# Altium PCB PCB_Final.PcbDoc (part 2 of 2)
Units mm, origin at the board's own origin, x right, y up, seen from the top; angles counter-clockwise.
Board outline 220 x 130 mm, 2 copper layers (Top Layer, Bottom Layer); 112 components, 88 nets, 442 pads, 69 vias.
Unrouted connection lines stored in the file: 1.
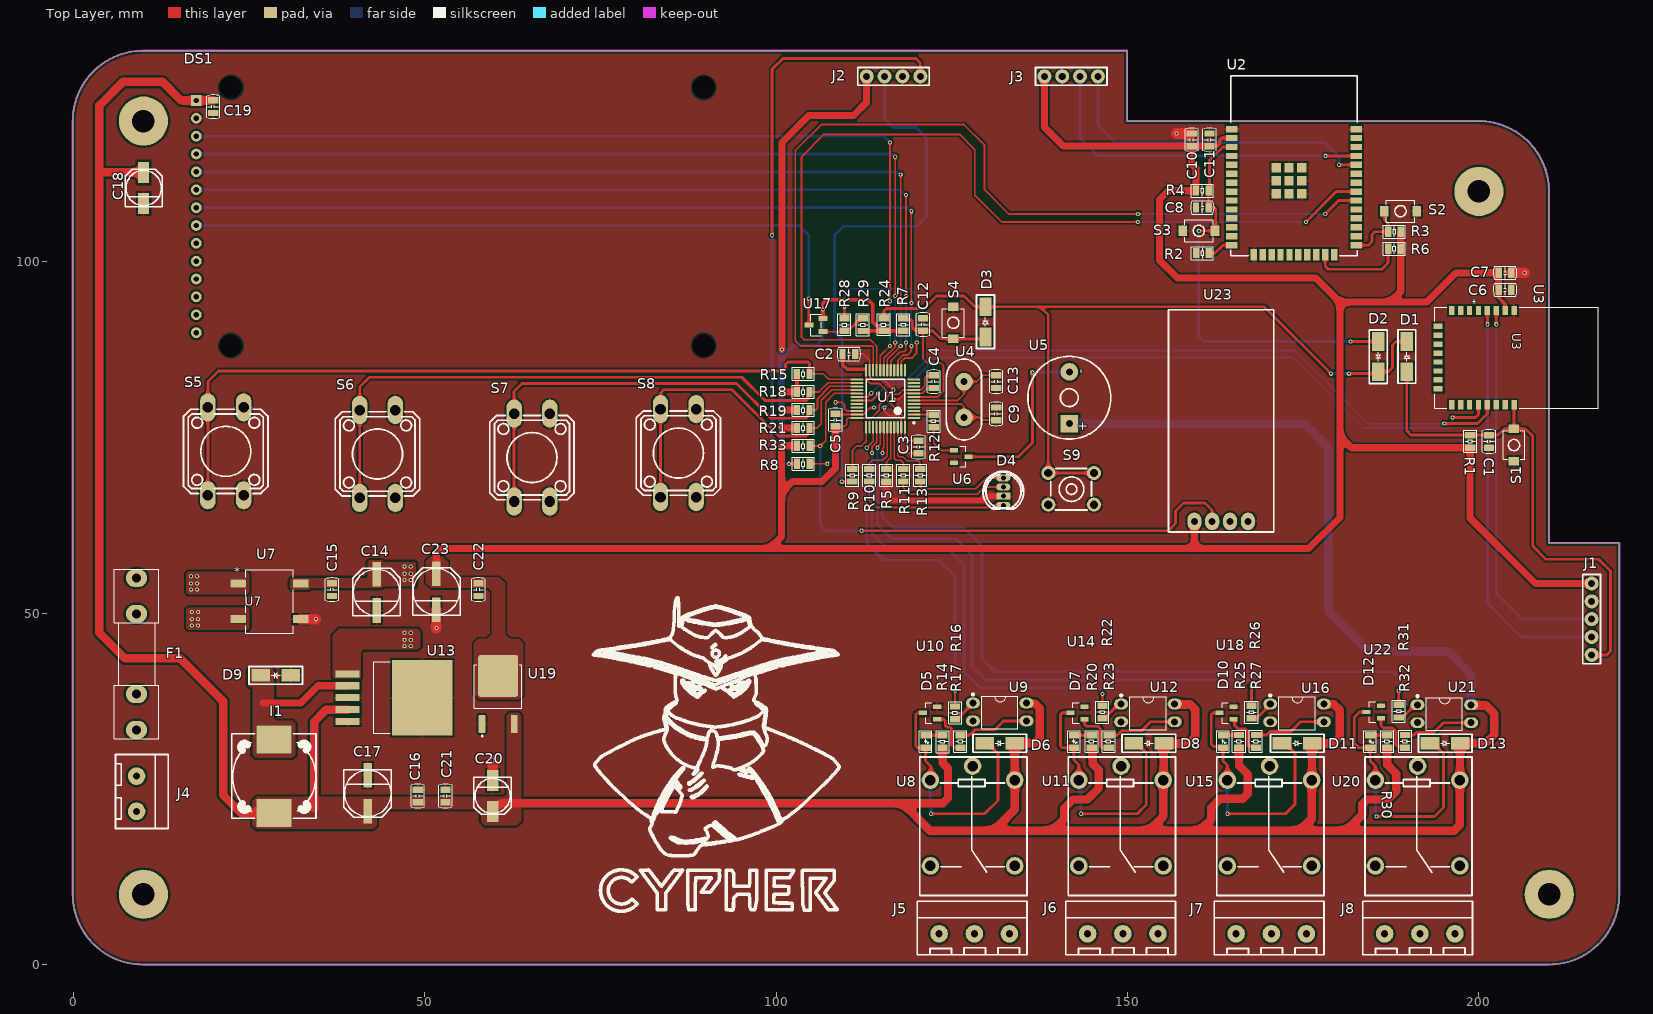
[diagram p0: Top Layer view]

## Polygon pours and split planes (outlines as drawn) (continued)
+12 on Top Layer "+12_L01_P032" (solid, pour order 32): 44.196,57.277 48.641,57.277 48.768,57.15 48.768,53.975 48.662,53.848 48.26,53.848 44.196,53.848
+12 on Top Layer "+12_L01_P023" (solid, pour order 23): 30.861,54.737 31.115,54.991 41.656,54.991 41.91,55.245 41.91,57.277 42.164,57.531 43.942,57.531 44.196,57.277 44.196,53.848 43.942,53.594 33.782,53.594 33.528,53.34 31.115,53.34 30.861,53.594
+12 on Top Layer "+12_L01_P029" (solid, pour order 29): 40.894,40.767 37.211,40.767 36.957,41.021 36.957,46.863 37.846,47.752 49.022,47.752 49.403,47.371 49.403,45.212 49.022,44.831 41.275,44.831 40.894,44.45
+5 on Top Layer "+5_L01_P026" (solid, pour order 26): 61.715,35.433 62.096,35.814 63.366,35.814 63.747,35.433 63.747,20.434 63.115,19.812 61.715,19.812

## Keep-outs
Keep-Out Layer:
  the board outline again, w0.3

## Silkscreen, mask and mechanical layers (free items; w line width, h text height)
Top Overlay:
  drawing of 6254 lines, arcs and shapes, not listed
Mechanical 1:
  the board outline again, w0.013

## Text inside footprints (layer, text, board x,y; h text height)
U3: Top Overlay "*" at 198.374,94.742 h1.27 r270; Mechanical 13 "*" at 204.374,92.1 h1.27 r270
U5: Top Overlay "-" at 142.892,84.689 h1.27 r270; Top Overlay "+" at 143.062,77.323 h1.27 r270
U7: Top Overlay "*" at 22.936,55.254 h1.27; Mechanical 13 "*" at 24.752,54.737 h1.27